# Altium PCB PCB_SPSU-v4.0.0.PcbDoc
Units mil, origin at the board's own origin, x right, y up, seen from the top; angles counter-clockwise.
Board outline 1757.74 x 2141.82 mil, 2 copper layers (Top Layer, Bottom Layer), stack 61.811 mil thick; 47 components, 33 nets, 165 pads, 303 vias.
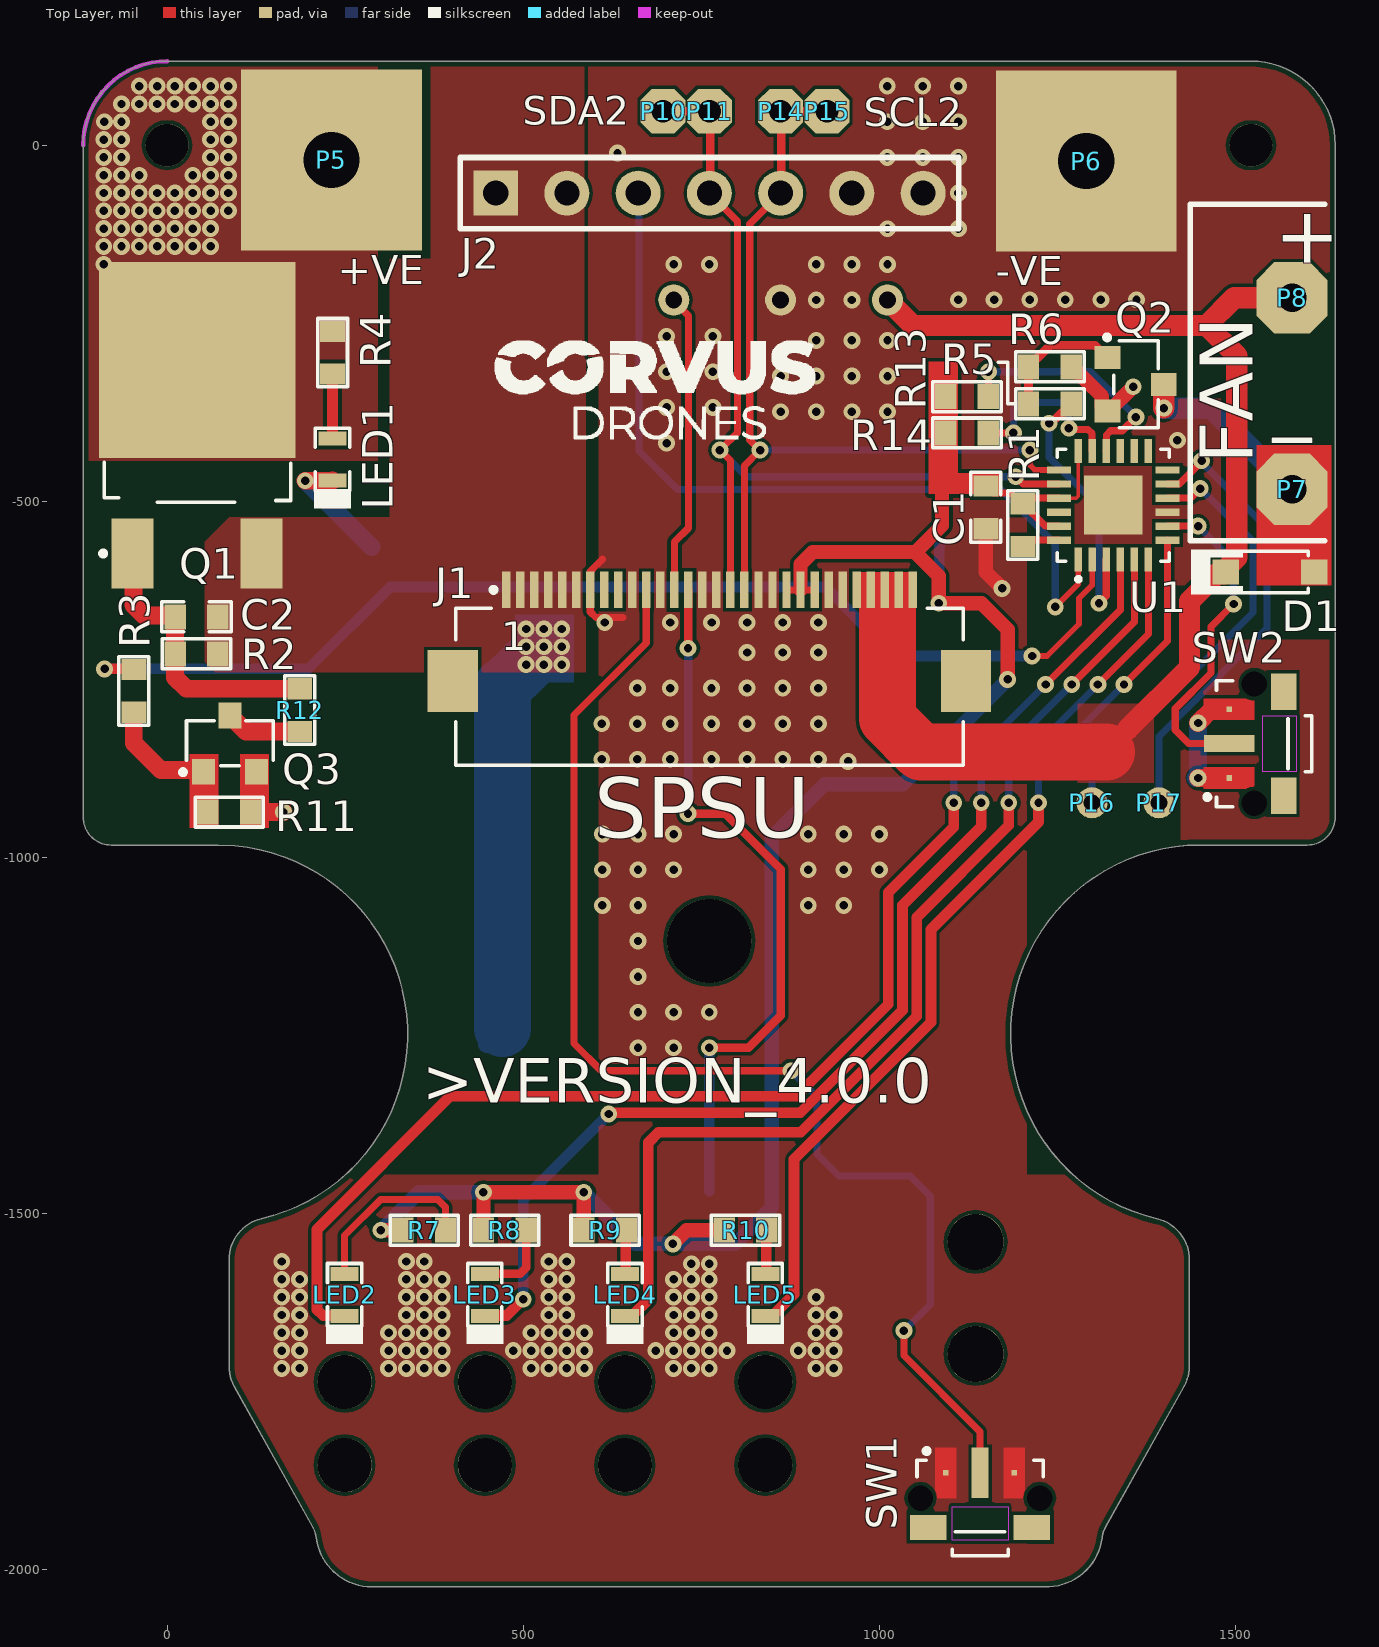
[diagram p0: Top Layer view]
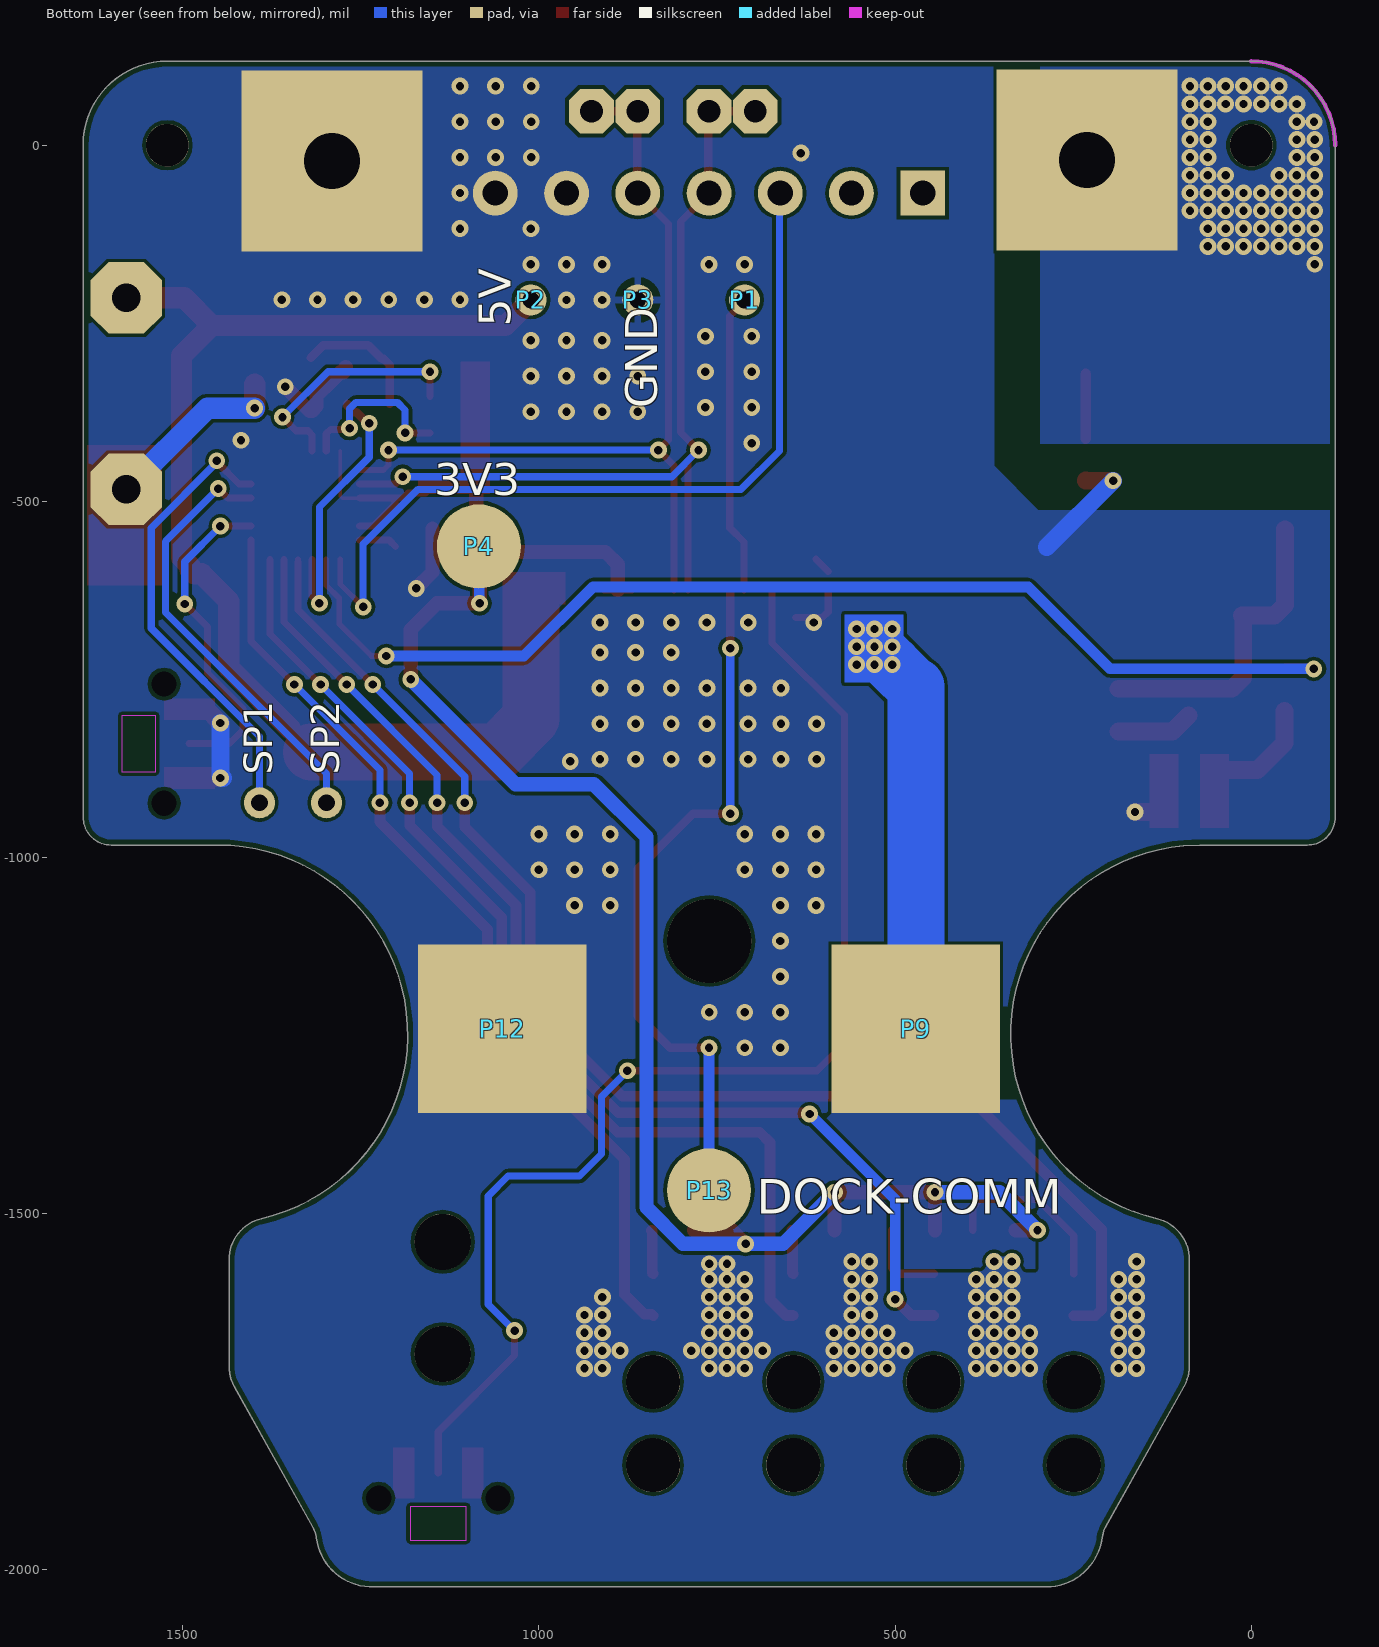
[diagram p1: Bottom Layer view, seen from below]
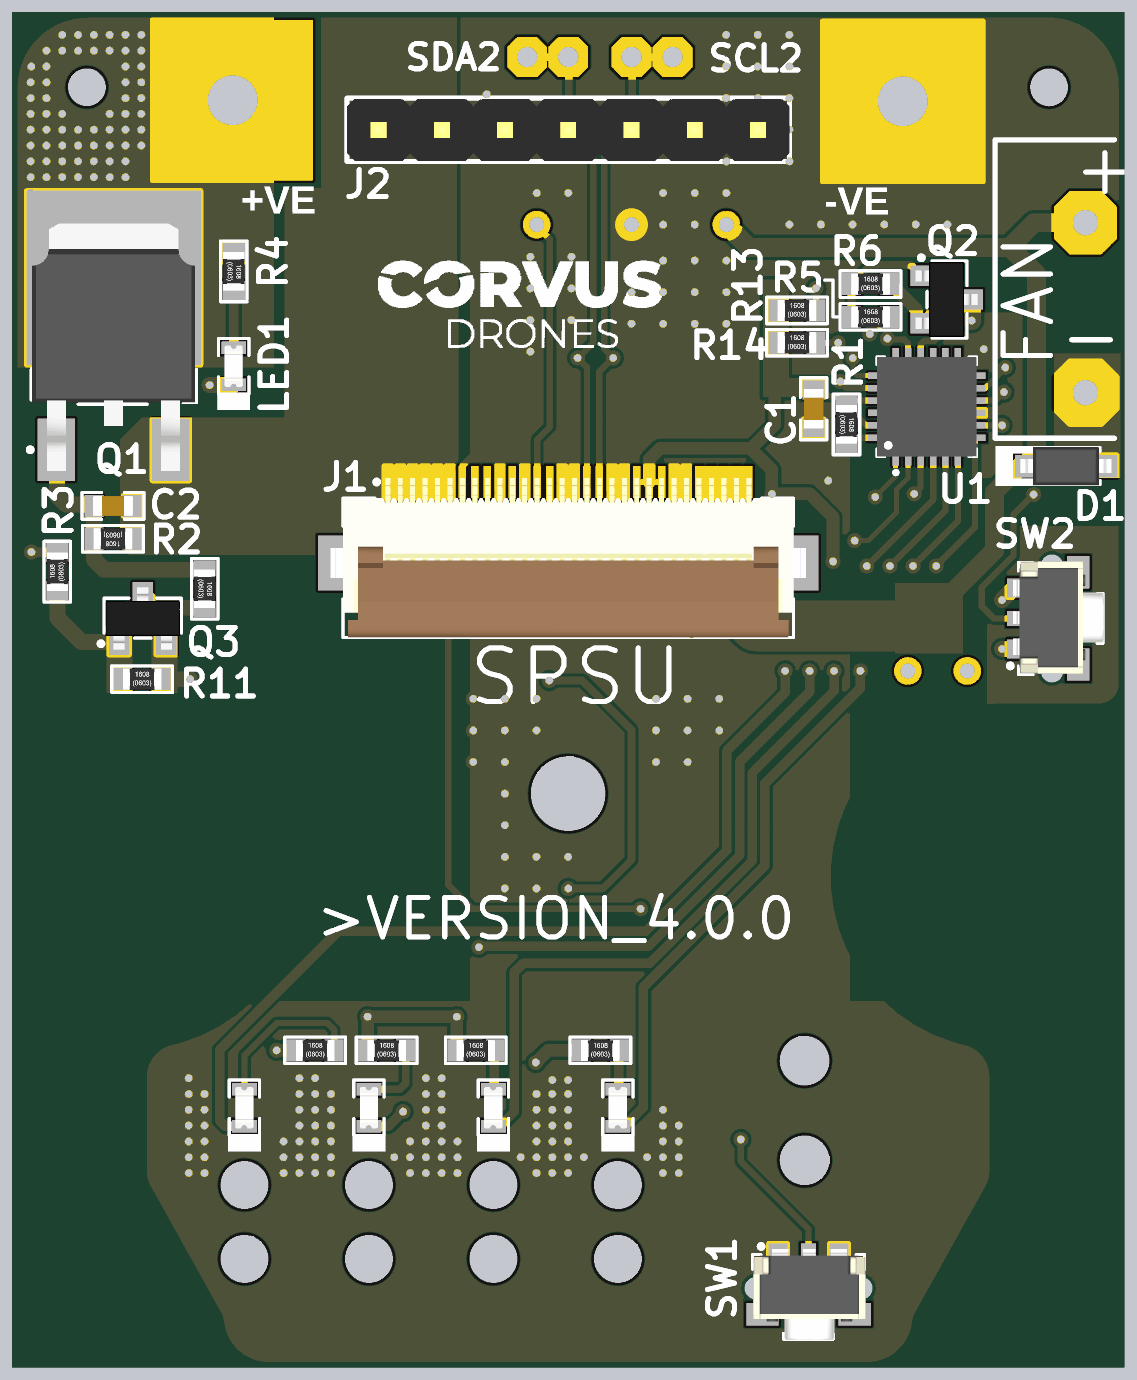
[diagram p2: 3D render of the assembled board from above, using the file's embedded part models]

## Layer stack, top to bottom
Top Solder: solder mask 0.3937, Solder Resist, Dk 3.5
Top Layer: signal copper 1.378
Dielectric 1: core 59.0551, FR-4, Dk 4.8
Bottom Layer: signal copper 1.378
Bottom Solder: solder mask 0.3937, Solder Resist, Dk 3.5

## Board outline
204.87,-1940.69 94.44,-1742.51 cw(c146.03,-1713.76) 86.97,-1713.76 86.97,-1564.54 cw(c146.02,-1564.54) 132.57,-1507.04 ccw(c72.05,-1248.28) 95.21,-983.54 72.05,-982.52 -78.47,-982.52 cw(c-78.47,-943.15) -117.84,-943.15 -117.84,-0.15 cw(c0.27,-0.14) -10.03,117.52 0.27,117.96 1521.79,117.96 cw(c1521.8,-0.15) 1639.46,10.15 1639.9,-0.15 1639.9,-943.15 cw(c1600.53,-943.15) 1603.97,-982.37 1600.53,-982.52 1450.01,-982.52 ccw(c1450.01,-1248.27) 1389.49,-1507.04 cw(c1376.04,-1564.54) 1435.09,-1564.54 1435.09,-1713.76 cw(c1376.03,-1713.76) 1427.62,-1742.51 1317.19,-1940.69 ccw(c1351.56,-1959.88) 1314.38,-1946.95 1313.4,-1950.24 1312.71,-1953.6 1312.52,-1954.94 cw(c1234.4,-1945.12) 1238.29,-2023.76 1234.39,-2023.86 287.67,-2023.86 cw(c287.67,-1945.12) 211.61,-1965.5 210.12,-1958.8 209.54,-1954.94 208.1,-1948.23 206.94,-1945 205.51,-1941.88

## Design rules (kind name [scope] priority, off if disabled: settings)
BoardOutlineClearance mdCopperDimension [All] p1: gap=10 ignorepadtopadclearanceinfootprint=FALSE except(0: Arc-SplitContinuation Track-SplitContinuation SMDPad-SplitContinuation THPad-SplitContinuation Via-SplitContinuation Fill-SplitContinuation Poly-SplitContinuation Region-SplitContinuation Text-SplitContinuation; 1: Arc-OutlineEdge Fill-OutlineEdge Text-OutlineEdge; 5: Track-OutlineEdge; 7.87: Poly-OutlineEdge Poly-CavityEdge Poly-CutoutEdge Poly-SplitBarrior)
Clearance [All] p1: gap=5 ignorepadtopadclearanceinfootprint=FALSE
HoleSize [All] p1: absolutevalues=TRUE maxlimit=99999 minlimit=11.8 maxpercent=80.000 minpercent=20.000
HoleToHoleClearance [All] p1: gap=6 allowstackedmicrovias=TRUE
MinimumSolderMaskSliver [All] p1: minsoldermaskwidth=0
PolygonConnect [All] p1: connectstyle=Direct reliefconductorwidth=10 reliefentries=4 polygonreliefangle="90 Angle" airgapwidth=10
RoutingVias [All] p1: holewidth=11.81 width=23.62 viastyle="Through Hole" minholewidth=11.81 minwidth=23.62 maxholewidth=100 maxwidth=100
SilkToSilkClearance [All] p1: silktosilkclearance=3
SilkToSolderMaskClearance [IsPad] p1: minsilkscreentomaskgap=0 clearancetoexposedcopper=TRUE
SolderMaskExpansion [All] p1: expansion=4 istentingtop=FALSE
UnRoutedNet [All] p1: checkbadconnections=TRUE
Width [All] p1: maxlimit=100 minlimit=5 preferedwidth=12 minimp=50.000000 maximp=50.000000 favimp=50.000000
24 further rules are at their usual default settings.

## Classes and differential pairs
component class "U_Pad Connections": J2 P9 P10 P11 P12 P13 P14 P15
component class "U_MOSFET Driving": C2 D1 LED1 P5 P6 P7 P8 Q1 Q2 Q3 R2 R3 R4 R5 R6 R11 R12
component class U_IO-Extender: C1 P16 P17 R1 R13 R14 SW2 U1
component class "U_HMI Part": LED2 LED3 LED4 LED5 R7 R8 R9 R10 SW1
component class "U_Connection Powermodule": J1 P1 P2 P3 P4

## Components (designator, comment, footprint, x,y, rotation, side; value= is the part's Value field where it differs from the comment)
C1 "0.1uF" CAP-0603 1149.3,-508.46 r90 top
C2 "0.1uF" CAP-0603 41.27,-662.14 r0 top
D1 "1N4148W" SOD-123 1548.27,-599.14 r180 top
J1 "FH12-30S-0.5SH(55)" FH12-30S-0.5SH(55) 761.3,-688.31 r0 top locked
J2 "DNP" "HDR 1X7" 461.3,-67.31 r90 top locked
LED1 "BLUE" LED-0603 232.3,-441.31 r270 top
LED2 "WHITE" LED-0603 249.22,-1613.92 r270 top
LED3 "WHITE" LED-0603 446.07,-1613.92 r270 top
LED4 "WHITE" LED-0603 642.92,-1613.92 r270 top
LED5 "WHITE" LED-0603 839.77,-1613.92 r270 top
P1 "THT Pad" TH-0.75/0.6 711.3,-217.31 r90 bottom locked
P2 "THT Pad" TH-0.75/0.6 1011.3,-217.31 r90 bottom locked
P3 "THT Pad" TH-0.75/0.6 861.3,-217.31 r90 bottom locked
P4 "SMD-Pad3mm" "3MM SMD PAD" 1084.3,-563.31 r180 bottom
P5 "THT-Pad 6.5mm" 6.5MM-THTPAD#1 430.27,-41.14 r0 top
P6 "THT-Pad 6.5mm" 6.5MM-THTPAD#2 856.27,-52.39 r0 top
P7 "Wirepad 2.54/1.0" "WIREPAD 2.54/1.0" 1579.3,-483.14 r0 top locked
P8 "Wirepad 2.54/1.0" "WIREPAD 2.54/1.0" 1579.3,-214.31 r0 top locked
P9 "SMD-Pad6mm" "6.0MM-SMD PAD" 471.02,-1240.44 r180 bottom locked
P10 "Wirepad" WIREPAD#1 696.3,47.69 r0 top locked
P11 "Wirepad" WIREPAD#2 736.27,47.69 r0 top locked
P12 "SMD-Pad6mm" "6.0MM-SMD PAD" 1051.58,-1240.44 r180 bottom locked
P13 "SMD-Pad3mm" "3MM SMD PAD" 761.3,-1467.31 r180 bottom locked
P14 "Wirepad" WIREPAD#1 861.3,47.69 r0 top locked
P15 "Wirepad" WIREPAD#3 952.27,177.86 r0 top
P16 "THT Pad" TH-0.75/0.6 1298.27,-923.14 r90 top
P17 "THT Pad" TH-0.75/0.6 1392.27,-923.14 r90 top
Q1 "FDD4141(UMW)" TO-252-2L 42.3,-437.31 r0 top locked
Q2 "2N7002KT1G" SOT-23 1359.64,-335.74 r270 top
Q3 "2N7002KT1G" SOT-23 88.27,-840.14 r0 top
R1 "100K" RES-0603 1201.3,-533.31 r90 top
R2 "100K" RES-0603 41.27,-714.14 r0 top
R3 "4.7K" RES-0603 -46.73,-766.14 r270 top
R4 "1K" RES-0603 232.3,-291.31 r90 top
R5 "4.7K" RES-0603 1239.27,-363.14 r180 top
R6 "100K" RES-0603 1239.27,-311.31 r180 top
R7 "20R" RES-0603 361.03,-1523.17 r180 top
R8 "20R" RES-0603 474.03,-1523.17 r180 top
R9 "20R" RES-0603 615.03,-1523.17 r180 top
R10 "20R" RES-0603 812.03,-1523.17 r180 top
R11 "100K" RES-0603 87.27,-936.14 r180 top
R12 "4.7K" RES-0603 186.27,-793.14 r90 top
R13 "4.7K" RES-0603 1123,-353 r180 top
R14 "DNP" RES-0603 1123,-404 r180 top
SW1 "TL3340AF160QG" TL3340AF160QG 1141.3,-1902.31 r0 top
SW2 "TL3340AF160QG" TL3340AF160QG 1529.27,-840.14 r90 top locked
U1 "PCAL6416AHF,128" QFN-24-EP(4X4) 1328.3,-505.31 r90 top locked

## Footprints (in the part's own frame and the unit in brackets; to place one, negate y for a bottom-side part, rotate by r counter-clockwise, add the part's x,y. Pads: shape width x height; smd on the part's side, far side on the other; paste and mask are expansions set on the pad)
"3MM SMD PAD" [mm]
  round 3 smd: 1(0,0)
"6.0MM-SMD PAD" [mm]
  rect 6x6 smd: 1(0,0)
6.5MM-THTPAD#1 [mil]
  rect 254x254 hole 78.74: 1(-199.72,20.58)
6.5MM-THTPAD#2 [mil]
  rect 254x254 hole 78.74: 1(434.03,30.08)
CAP-0603 [mil]
  rect 30x35 smd mask+2.36: 1(-30,0) 2(30,0)
  silkscreen extent -49,-21 49,21, body extent -32,-16 31,16, height 34
FH12-30S-0.5SH(55) [mm]
  rect 0.3x1.3 smd paste-2: 1(-7.25,1.625) 2(-6.75,1.625) 3(-6.25,1.625) 4(-5.75,1.625) 5(-5.25,1.625) 6(-4.75,1.625) 7(-4.25,1.625) 8(-3.75,1.625) 9(-3.25,1.625) 10(-2.75,1.625) 11(-2.25,1.625) 12(-1.75,1.625) 13(-1.25,1.625) 14(-0.75,1.625) 15(-0.25,1.625) 16(0.25,1.625) 17(0.75,1.625) 18(1.25,1.625) 19(1.75,1.625) 20(2.25,1.625) 21(2.75,1.625) 22(3.25,1.625) 23(3.75,1.625) 24(4.25,1.625) 25(4.75,1.625) 26(5.25,1.625) 27(5.75,1.625) 28(6.25,1.625) 29(6.75,1.625) 30(7.25,1.625)
  rect 1.8x2.2 smd: S1(-9.15,-1.625) S2(9.15,-1.625)
  silkscreen extent -9.05,-4.62 9.05,1.68, body extent -9.55,-4.62 9.55,1.78, height 2.09
"HDR 1X7" [mm]
  rect 1.6x1.6 hole 0.9: 1(0,0)
  round 1.6 hole 0.9: 2(0,-2.54) 3(0,-5.08) 4(0,-7.62) 5(0,-10.16) 6(0,-12.7) 7(0,-15.24)
  silkscreen extent -1.27,-16.51 1.27,1.27, body extent -1.24,-16.51 1.25,1.27, height 8.74
LED-0603 [mm]
  rect 0.5x1 smd: 1(-0.75,0) 2(0.75,0)
  silkscreen extent -1.12,-0.66 1.75,0.66, body extent -0.82,-0.37 0.82,0.36, height 0.68
QFN-24-EP(4X4) [mm]
  rect 0.86x0.26 smd: 1(-1.935,1.25) 2(-1.935,0.75) 3(-1.935,0.25) 4(-1.935,-0.25) 5(-1.935,-0.75) 6(-1.935,-1.25) 13(1.935,-1.25) 14(1.935,-0.75) 15(1.935,-0.25) 16(1.935,0.25) 17(1.935,0.75) 18(1.935,1.25)
  rect 0.26x0.86 smd: 7(-1.25,-1.935) 8(-0.75,-1.935) 9(-0.25,-1.935) 10(0.25,-1.935) 11(0.75,-1.935) 12(1.25,-1.935) 19(1.25,1.935) 20(0.75,1.935) 21(0.25,1.935) 22(-0.25,1.935) 23(-0.75,1.935) 24(-1.25,1.935)
  rect 2.1x2.1 smd paste-0.39: 25(0,0)
  silkscreen extent -2.69,-2 2,2, body extent -2,-2 2,2, height 0.8
RES-0603 [mil]
  rect 30x35 smd: 1(-30,0) 2(30,0)
  silkscreen extent -48,-21 48,21, body extent -31,-17 31,17, height 18
SOD-123 [mm]
  rect 0.95x0.9 smd: 1(-1.575,0) 2(1.575,0)
  silkscreen extent -1.37,-0.8 2.82,0.8, body extent -1.82,-0.78 1.83,0.78, height 1.5
SOT-23 [mm] "TRANS NPN 40V 0.6A SOT23"
  rect 0.82x0.92 smd: 1(-0.95,-1) 2(0.95,-1) 3(0,1)
  silkscreen extent -1.73,-1.07 1.55,0.81, body extent -1.5,-1.25 1.5,1.25, height 1.05
TH-0.75/0.6 [mm]
  round 1.108 hole 0.6: 1(0,0)
TL3340AF160QG [mm]
  rect 0.2x0.2 smd paste-1 mask+0: 1(-1.225,0.975) 1(-1.225,0.975) 3(1.225,0.975) 3(1.225,0.975)
  rect 0.6x1.8 smd: 2(0,0.975)
  rect 1.3x0.9 smd: S1(-1.85,-0.975) S2(1.85,-0.975)
  round 0 hole 0.9 unplated: ""(-2.125,0.075) ""(2.125,0.075)
  Top Layer region: -0.85,0.075 -1.525,0.075 -1.525,0.084 -1.525,0.102 -1.526,0.12 -1.529,0.138 -1.53,0.146 -1.53,0.146 -1.531,0.155 -1.533,0.173 -1.536,0.191 -1.54,0.209 -1.543,0.218 -1.545,0.228 -1.551,0.25 -1.557,0.271 -1.565,0.292 -1.569,0.302 -1.572,0.311 -1.579,0.327 -1.587,0.343 -1.595,0.358 -1.6,0.365 -1.6,0.375 -1.6,1.875 -0.85,1.875
  Top Layer region: 1.6,0.375 1.6,0.365 1.595,0.358 1.587,0.343 1.579,0.327 1.572,0.311 1.569,0.302 1.565,0.292 1.557,0.271 1.551,0.25 1.545,0.228 1.543,0.218 1.54,0.209 1.536,0.191 1.533,0.173 1.531,0.155 1.53,0.146 1.53,0.146 1.529,0.138 1.526,0.12 1.525,0.102 1.525,0.084 1.525,0.075 0.85,0.075 0.85,1.875 1.6,1.875
  Keep-Out Layer region: 1,-1.425 -1,-1.425 -1,-0.225 1,-0.225
  silkscreen extent -2.25,-1.97 2.25,1.8, body extent -2.21,-2.01 2.29,1.65, height 3.21
TO-252-2L [mm]
  rect 1.5x2.5 smd: 1(-2.3,-3.45) 3(2.3,-3.45)
  rect 7x7 smd: 2(0,3.45)
  silkscreen extent -3.4,-3.51 3.33,-0.2, body extent -3.27,-4.31 3.27,5.63, height 2.34
WIREPAD#1 [mm]
  oct 1.6x1.6 hole 0.813: 1(0,0)
WIREPAD#2 [mm]
  oct 1.6x1.6 hole 0.813: 1(0.636,0)
WIREPAD#3 [mm]
  oct 1.6x1.6 hole 0.813: 1(-0.66,-3.306)
"WIREPAD 2.54/1.0" [mil]
  oct 100x100 hole 40: 1(0,0)

## Part data
C1 C2: library part CC0603KRX7R0BB104, "CAP CER 0.1UF 100V X7R 0603", Capacitance=100nF, Case Code (Imperial)=0603, Case Code (Metric)=1608, Dielectric=X7R, LCSC Part Number=C113803, MAnufacturer=Yageo, Max Operating Temperature=125°C, Min Operating Temperature=-55°C, Package Quantity=4000, Resistor Type=Ceramic, Supplier Part Number 1=311-1523-1-ND, Tolerance=10%, Voltage Rating=100V, Case/Package=0603, Category="Ceramic Capacitors", ComponentLink1Description=https://datasheet.ciiva.com/6277/mlccorderingcode-6277030.pdf?src-supplier=Digi-Key, ComponentLink1URL=https://datasheet.ciiva.com/6277/mlccorderingcode-6277030.pdf?src-supplier=Digi-Key, ComponentLink2Description=https://datasheet.ciiva.com/6277/mlccorderingcode-6277081.pdf?src-supplier=Digi-Key, ComponentLink2URL=https://datasheet.ciiva.com/6277/mlccorderingcode-6277081.pdf?src-supplier=Digi-Key, ComponentLink3Description=https://datasheet.ciiva.com/6277/mlccorderingcode-6277082.pdf?src-supplier=Digi-Key, ComponentLink3URL=https://datasheet.ciiva.com/6277/mlccorderingcode-6277082.pdf?src-supplier=Digi-Key, Depth=0.8mm, Item Type=Capacitor, Lead Free="Lead Free", Length=0.063inch, Manufacturer Part Number=CC0603KRX7R0BB104, Mount="Surface Mount", Packaging="Tape and Reel", Pricing 1="1=0.19000, 10=0.13500, 50=0.07680, 100=0.06370, 500=0.04466, 1000=0.03696 (USD)", RoHS=Yes, RoHS Compliant=Yes, Series=CC, Stock 1=60476, Supplier 1=Digi-Key, Termination=SMD/SMT, Thickness=0.035inch, Voltage Rating (DC)=100V, Weight=7.1E-05oz, Width=0.031inch
D1: LCSC Part Number=C917030, MAnufacturer=JSMSEMI, Package=SOD-123, ComponentLink1Description=LCSC, ComponentLink1URL=https://www.lcsc.com/product-detail/Switching-Diode_JSMSEMI-1N4148W_C917030.html, Item=Diode, Manufacturer Part Number=1N4148W
J1: "CONN FFC BOTTOM 30POS 0.5MM R/A", Actuator Color=Brown, Color=Beige,Brown, Contact Resistance=50mR, Contact Voltage Rating (AC)=50V, Current Rating=500mA, Flammability Rating="UL94 V-0", Housing Color=Beige, Insulation Resistance=500MR, LCSC Part Number=C506793, MAnufacturer=Hirose, Max Current Rating=400mA, Max Operating Temperature=70°C, Min Operating Temperature=-40°C, Package Quantity=2000, Supplier Part Number=7018136, Actuator Material=Polyphenylene, Category="FFC / FPC", ComponentLink1Description=https://datasheet.ciiva.com/11745/0900766b80d985fc-11745247.pdf?src-supplier=Rs, ComponentLink1URL=https://datasheet.ciiva.com/11745/0900766b80d985fc-11745247.pdf?src-supplier=Rs, ComponentLink2Description=https://datasheet.ciiva.com/15176/getdatasheetpartid-439676-15176854.pdf?src-supplier=Verical, ComponentLink2URL=https://datasheet.ciiva.com/15176/getdatasheetpartid-439676-15176854.pdf?src-supplier=Verical, ComponentLink3Description=https://datasheet.ciiva.com/7661/58803-7661387.pdf?src-supplier=Element14, ComponentLink3URL=https://datasheet.ciiva.com/7661/58803-7661387.pdf?src-supplier=Element14, ComponentLink4Description=https://datasheet.ciiva.com/22630/58803-22630360.pdf?src-supplier=Farnell, ComponentLink4URL=https://datasheet.ciiva.com/22630/58803-22630360.pdf?src-supplier=Farnell, Connector type=4640ConnectorType, Contact Location=Bottom, Contact Material=Bronze, Contact Pitch=500um, Contact Plating=Gold, Depth=5.6mm, Gender=Female, Housing Material=Polyamide, Item Type="FFC/FPC Connector", Lead Free="Lead Free", Lead Pitch=0.5mm, Length=19.1mm, Manufacturer Part Number=FH12-30S-0.5SH(55), Material=Polyamide, Mating Cycles=20, Max Voltage Rating (AC)=50V, Mounting Technology="Surface Mount", Number of Contacts=30, Number of Positions=30, Number of Rows=1, Orientation="Right Angle", Packaging="Tape and Reel", Pitch=0.5mm, Pricing="1=2.27, 15=2.07, 50=1.97, 250=1.85, 1000=1.75 (USD)", Radiation Hardening=No, Reach SVHC Compliant=No, RoHS=Yes, RoHS Compliant=Yes, Series=FH12, Stock=1200, Supplier="Future Electronics", Termination=Solder, Voltage Rating=50V, Voltage Rating (AC)=50V, Width=19.1mm, Wire/Cable Type=Straight
J2: library part PZ254V-11-07P, LCSC Part Number=C492406, MAnufacturer=XFCN, Package=2.54mm, ComponentLink1Description=LCSC, ComponentLink1URL=https://www.lcsc.com/product-detail/Pin-Headers_XFCN-PZ254V-11-07P_C492406.html, Item Type=Header, Manufacturer Part Number=PZ254V-11-07P
LED1: library part NCD0603B1, "10mA 无色透明透镜 80mcd~220mcd 463nm~475nm -30℃~+85℃ Blue 130° 72mW 2.6V~3.6V 0603 Light Emitting Diodes (LED) ROHS", LCSC Part Number=C84266, MAnufacturer="Foshan NationStar Optoelectronics", Package=0603, ComponentLink1Description=LCSC, ComponentLink1URL=https://www.lcsc.com/product-detail/Light-Emitting-Diodes-LED_Foshan-NationStar-Optoelectronics-NCD0603B1_C84266.html, Item Type=LED, Manufacturer Part Number=NCD0603B1
LED2 LED3 LED4 LED5: library part NCD0603W1, "5mA 200mcd~300mcd 雾状黄透镜 -30℃~+85℃ White 130° 72mW 2.6V~3.6V 0603 Light Emitting Diodes (LED) ROHS", LCSC Part Number=C84265, MAnufacturer="Foshan NationStar Optoelectronics", Package=0603, ComponentLink1Description=LCSC, ComponentLink1URL=https://www.lcsc.com/product-detail/Light-Emitting-Diodes-LED_Foshan-NationStar-Optoelectronics-NCD0603W1_C84265.html, Item Type=LED, Manufacturer Part Number=NCD0603W1
P1 P2 P3 P16 P17: library part TH-0.75/0.6
P4 P13: "Wire Conncting PAD"
Q1: "TO-252 MOSFETs ROHS", LCSC Part Number=C5346825, MAnufacturer=UMW, Package=TO-252, Item Type=MOSFET, Manufacturer Part Number=FDD4141(UMW)
Q2 Q3: "MOSFET N-CH 60V 320MA SOT23-3", Case/Package=SOT-23-3, Continuous Drain Current (ID)=320mA, Drain to Source Breakdown Voltage=60V, Drain to Source Resistance=1.6R, Gate to Source Voltage (Vgs)=20V, Input Capacitance=24.5pF, LCSC Part Number=C116584, MAnufacturer="ON Semiconductor", Max Operating Temperature=150°C, Max Power Dissipation=420mW, Min Operating Temperature=-55°C, Package Quantity=1, Power Dissipation=300mW, Supplier Part Number=3445699, Threshold Voltage=2.3V, Category=MOSFETs, ComponentLink1Description=https://datasheet.ciiva.com/1254/2n7002k-d-1254499.pdf?src-supplier=Newark, ComponentLink1URL=https://datasheet.ciiva.com/1254/2n7002k-d-1254499.pdf?src-supplier=Newark, ComponentLink2Description=https://datasheet.ciiva.com/16220/2n7002k-d-16220919.pdf?src-supplier=Future+Electronics, ComponentLink2URL=https://datasheet.ciiva.com/16220/2n7002k-d-16220919.pdf?src-supplier=Future+Electronics, ComponentLink3Description=https://datasheet.ciiva.com/936/2n7002k-d-936793.pdf?src-supplier=Digikey, ComponentLink3URL=https://datasheet.ciiva.com/936/2n7002k-d-936793.pdf?src-supplier=Digikey, Contact Plating=Tin,Matte, Drain-source On Resistance-Max=1.6R, Element Configuration=Single, Fall Time=9ns, Halogen Free="Halogen Free", Height=1.01mm, Item Type=MOSFET, Lead Free="Lead Free", Length=3.04mm, Manufacturer Part Number=2N7002KT1G, Nominal Vgs=2.3V, Number of Channels=1NUMBER, Number of Elements=1, Packaging="Tape and Reel", Pins=3, Polarity=N-CHANNEL, Pricing="3000=0.0238, 12000=0.0228, 45000=0.0218, 75000=0.0215, 150000=0.0204 (USD)", Radiation Hardening=No, Rds On Max=1.6R, Reach SVHC Compliant=No, Rise Time=9ns, RoHS=Yes, RoHS Compliant=Yes, Series=-, Stock=51000, Supplier="Future Electronics", Turn-Off Delay Time=55.8ns, Turn-On Delay Time=12.2ns, Width=1.4mm
R1 R2 R6 R11: library part RC0603JR-07100KL, "RES 100K OHM 5% 1/10W 0603", Case Code (Imperial)=0603, Case Code (Metric)=1608, LCSC Part Number=C100048, MAnufacturer=Yageo, Max Operating Temperature=155°C, Max Power Dissipation=100mW, Min Operating Temperature=-55°C, Resistance=100kR, Resistance Tolerance=5%, Resistor Type="Thick Film", Supplier Part Number 1=311-100KGRCT-ND, Temperature Coefficient=100ppm/°C, Voltage Rating=50V, Case/Package=0603, Category="Chip SMD Resistors", ComponentLink1Description=https://datasheet.ciiva.com/7746/443971-7746424.pdf?src-supplier=Element14, ComponentLink1URL=https://datasheet.ciiva.com/7746/443971-7746424.pdf?src-supplier=Element14, ComponentLink2Description=https://datasheet.ciiva.com/7983/443971-7983686.pdf?src-supplier=Element14, ComponentLink2URL=https://datasheet.ciiva.com/7983/443971-7983686.pdf?src-supplier=Element14, ComponentLink3Description=https://datasheet.ciiva.com/7746/443971-7746423.pdf?src-supplier=Element14, ComponentLink3URL=https://datasheet.ciiva.com/7746/443971-7746423.pdf?src-supplier=Element14, ComponentLink4Description=https://datasheet.ciiva.com/8887/pyu-rc0603-51-rohs-l-4-8887903.pdf?src-supplier=Avnet, ComponentLink4URL=https://datasheet.ciiva.com/8887/pyu-rc0603-51-rohs-l-4-8887903.pdf?src-supplier=Avnet, Contact Plating=Tin,Matte, Features="Moisture Resistant", Item Type=Resistor, Lead Free="Lead Free", Manufacturer Part Number=RC0603JR-07100KL, Number of Pins=2, Number of Terminations=2, Packaging="Tape and Reel", Power Rating=100mW, Pricing 1="1=0.10000, 10=0.02000, 100=0.00800, 1000=0.00360, 2500=0.00312 (USD)", Radiation Hardening=No, REACH SVHC="No SVHC", RoHS=Yes, RoHS Compliant=Yes, Series=RC, Size Code=0603, Stock 1=1210037, Supplier 1=Digi-Key, Termination=SMD/SMT, Tolerance=5%, Voltage Rating (DC)=50V, Width=0.8mm
R3 R5 R12 R13: library part RC0603FR-074K7L, "RES SMD 4.7K OHM 1% 1/10W 0603", LCSC Part Number=C99782, MAnufacturer=Yageo, Package=0603, ComponentLink7Description=LCSC, ComponentLink7URL=https://www.lcsc.com/product-detail/Chip-Resistor-Surface-Mount_YAGEO-RC0603FR-074K7L_C99782.html, Item Type=Resistor, Manufacturer Part Number=RC0603FR-074K7L
R4: library part RC0603FR-071KL, "100mW Thick Film Resistors 75V ±100ppm/℃ ±1% 1kΩ 0603 Chip Resistor - Surface Mount ROHS", LCSC Part Number=C22548, MAnufacturer=YAGEO, Package=0603, ComponentLink1Description=LCSC, ComponentLink1URL=https://www.lcsc.com/product-detail/Chip-Resistor-Surface-Mount_YAGEO-RC0603FR-071KL_C22548.html, Item=Resistor, Manufacturer Part Number=RC0603FR-071KL
R7 R8 R9 R10: library part 0603WAF200JT5E, "100mW Thick Film Resistors ±100ppm/℃ ±1% 20Ω 0603 Chip Resistor - Surface Mount ROHS", LCSC Part Number=C22950, MAnufacturer="UNI-ROYAL(Uniroyal Elec)", Package=0603, ComponentLink1Description=LCSC, ComponentLink1URL=https://www.lcsc.com/product-detail/Chip-Resistor-Surface-Mount_UNI-ROYAL-Uniroyal-Elec-0603WAF200JT5E_C22950.html, Item Type=Resistor, Manufacturer Part Number=0603WAF200JT5E
R14: Package=0603, ComponentLink1Description=LCSC, Item Type=Resistor
SW1 SW2: "Switch Tactile N.O. SPST Round Button Gull Wing 0.05A 12VDC 100000Cycles 1.57N SMD", Case/Package=SMD/SMT, Color=White, Contact Current Rating=50mA, Contact Resistance=500mR, MAnufacturer=E-Switch, Max Operating Temperature=85°C, Max Voltage Rating (DC)=12V, Min Operating Temperature=-35°C, Operating Force=160gf, Package Quantity=1, Supplier Part Number=9232661, Actuator Length=0.85mm, Actuator Material=Polyphthalamide, Actuator Type=Standard, Category="Tactile Switches", ComponentLink1Description=https://datasheet.ciiva.com/7637/tl3340-7637667.pdf?src-supplier=Element14, ComponentLink1URL=https://datasheet.ciiva.com/7637/tl3340-7637667.pdf?src-supplier=Element14, ComponentLink2Description=https://datasheet.ciiva.com/5284/tl3340-28153-5284108.pdf?src-supplier=Mouser, ComponentLink2URL=https://datasheet.ciiva.com/5284/tl3340-28153-5284108.pdf?src-supplier=Mouser, ComponentLink3Description=https://datasheet.ciiva.com/2900/p021301b-2900825.pdf?src-supplier=Digikey, ComponentLink3URL=https://datasheet.ciiva.com/2900/p021301b-2900825.pdf?src-supplier=Digikey, ComponentLink4Description=https://datasheet.ciiva.com/2900/p021301b-2900826.pdf?src-supplier=Digikey, ComponentLink4URL=https://datasheet.ciiva.com/2900/p021301b-2900826.pdf?src-supplier=Digikey, ComponentLink5Description=https://datasheet.ciiva.com/2900/p021301b-2900827.pdf?src-supplier=Digikey, ComponentLink5URL=https://datasheet.ciiva.com/2900/p021301b-2900827.pdf?src-supplier=Digikey, Contact Material="Stainless Steel,Silver", Contact Plating="Stainless Steel,Silver", Current Rating=50mA, Electrical Life=100000Cycles, Height=3.55mm, Housing Material=Polyphthalamide, Illumination Type=Non-Illuminated,Illuminated, Lead Free=5697LeadFree, Manufacturer Part Number=TL3340AF160QG, Mechanical Life=100000Cycles, Mounting Technology="Surface Mount", Number of Positions=2NUMBER, Orientation="Right Angle", Packaging="Tape and Reel", Pricing="2000=0.27 (USD)", Reach SVHC Compliant=No, RoHS=Yes, RoHS Compliant=Yes, Series=TL3340, Size=3.3mm, Stock=16000, Supplier="Future Electronics", Switch Function=Off-Mom, Switch Travel=0.2mm, Termination="Gull Wing", Throw Configuration=SPST, Voltage Rating (DC)=12V
U1: "IC XPND 400KHZ I2C SMBUS 24HWQFN", Clock Frequency=100kHz, Frequency=400kHz, LCSC Part Number=C2652287, MAnufacturer="NXP Semiconductors", Max Operating Temperature=85°C, Max Supply Voltage=5.5V, Min Operating Temperature=-40°C, Min Supply Voltage=1.65V, Nominal Supply Current=1.1mA, Output Current=25mA, Package Quantity=1, Supplier Part Number=75X0096, Category="Interface ICs", ComponentLink1Description=https://datasheet.ciiva.com/46433/1845292-46433847.pdf?src-supplier=Element14, ComponentLink1URL=https://datasheet.ciiva.com/46433/1845292-46433847.pdf?src-supplier=Element14, ComponentLink2Description=https://datasheet.ciiva.com/6633/pcal6416a-6633094.pdf?src-supplier=Digikey, ComponentLink2URL=https://datasheet.ciiva.com/6633/pcal6416a-6633094.pdf?src-supplier=Digikey, ComponentLink3Description=https://datasheet.ciiva.com/6633/pcal6416a-6633096.pdf?src-supplier=Digikey, ComponentLink3URL=https://datasheet.ciiva.com/6633/pcal6416a-6633096.pdf?src-supplier=Digikey, Height=800um, Interface=I2C, Item Type=IC, Lead Free="Lead Free", Manufacturer Part Number=PCAL6416AHF,128, Mounting Technology="Surface Mount", Number of I/Os=16, Packaging="Tape and Reel", Pins=24, Pricing="1=1.23, 10=1.05, 25=0.969, 50=0.887 (USD)", Reach SVHC Compliant=No, RoHS=Yes, RoHS Compliant=Yes, Series=-, Stock=5086, Supplier=Avnet

## Free pads (board coordinates)
  round 75.98 hole 75.98 unplated: MH1(839.77,-1853) MH2(839.77,-1736.07) MH3(249.22,-1736.07) MH4(249.22,-1853) MH5(446.07,-1736.07) MH6(642.92,-1853) MH7(642.92,-1736.07) MH8(446.07,-1853)
  round 78.74 hole 78.74 unplated: MH9(1135.05,-1539.52) MH10(1135.05,-1697)
  round 60 hole 60 unplated: MH11(0,0) MH12(1521.68,-0.11)
  round 118.11 hole 118.11 unplated: MH13(761.03,-1117.17)

## Via types
v1: diameter 23.62, hole 11.81, Top Layer to Bottom Layer, tented both sides, 214 vias
v2: diameter 23.62/23.62 (per signal layer), hole 11.81, Top Layer to Bottom Layer, tented both sides, 89 vias

## Nets (pads, with @x,y where several pads share a name; then routed paths per layer and width w, separated by ;. In a path a pad name is that pad's centre, name@x,y a point inside that pad or via, vN(x,y) a via of type N, cw(c..) or ccw(c..) an arc to the next point about the centre after c; other vN are vias at no path point)
+3V3: C1.2 J1.21 J1.22 J1.23 P4.1 R1.2 R7.2 R8.2 R9.2 R10.2 R13.2 R14.2 U1.18 U1.21 U1.23 | length 2783.5
  Top Layer w5: R1.2 R1.2@1209.14,-495.47 ; U1.21 1276.17,-495.47 1279.1,-492.54 U1.18
  Top Layer w10: J1.21 J1.22 J1.23 ; C1.2 1159.3,-488.46 1183.95,-488.46 1190.96,-495.47 1209.14,-495.47 U1.21 ; R1.2 1232.83,-534.84 U1.23
  Top Layer w15: C1.2@1136.3,-481.96 1139.3,-481.96 C1.2@1146.05,-475.21
  Top Layer w20: v1@301.36,-1523.17 R7.2 ; R8.2 v1(444.03,-1470) v1(585.03,-1470) R9.2 ; v1(710,-1542.37) 729.2,-1523.17 R10.2 ; J1.22 889.25,-588.34 906.45,-571.14 1049.62,-571.14 ; 1093,-467 1088,-472 1088,-534 1050.86,-571.14 1049.62,-571.14 ; v1(1180,-750) 1180,-680 1143.14,-643.14 v1(1083.27,-643.14) 1083.26,-604.78 1049.62,-571.14
  Bottom Layer w15: v1(1083.27,-643.14) 1083.79,-642.63 1083.79,-563.83 P4.1
  Bottom Layer w20: v1(300.17,-1523.17) 353.34,-1470 v1@444,-1470 ; v1(585.03,-1470) 657.4,-1542.37 v1(710,-1542.37) 797.63,-1542.37 849,-1491 849,-971 923,-897 1033,-897 v1(1180,-750)
+5V: D1.2 J1.26 J1.27 J1.28 J1.29 J1.30 P2.1 P8.1 | length 1757.4
  Top Layer w10: J1.26 J1.27
  Top Layer w30: P2.1 1047.13,-253.14 1459.27,-253.14 ; 1348.39,-820.02 1435.27,-733.14 1435.27,-640.12 1473.53,-601.86 1483.55,-601.86 D1.2 1487.25,-599.14 1489.96,-596.43 1489.96,-590.72 1501.83,-578.85 1501.83,-295.7 1459.27,-253.14 ; P8.1 1498.1,-214.31 1459.27,-253.14
  Top Layer w80: J1.28@1011.31,-647.96 1011.31,-805.14 1058.17,-852 1254,-852 1319,-852
DOCK-COMM: J1.14 P13.1 | length 1002.4
  Top Layer w12: v1(731.3,-938.29) 783.42,-938.29 861.3,-1016.17 861.3,-1222.11 816.27,-1267.14 v1(761.27,-1267.17) ; v1@731.77,-706.29 J1.14
  Bottom Layer w12: v1(731.3,-938.29) v1(731.3,-706.29)
  Bottom Layer w15: P13.1@761.3,-1468.71 v1@761.3,-1267.2
GND: C1.1 J1.7 J1.10 J1.12 J1.15 J1.16 J1.19 J1.20 J1.24 J1.25 J2.6 J2.7 LED1.2 P3.1 P6.1 P12.1 Q2.2 Q3.2 R6.1 R11.1 SW1.1 SW1.3 SW2.1 SW2.3 U1.9 U1.25 | length 723.7
  Top Layer w10: J1.7 593.98,-654.97 602.3,-663.29 640.03,-663.29 ; 593.98,-598.38 603.61,-588.75 ; 603.84,-588.75 611.3,-581.29
  Top Layer w20: C1.1 1149.3,-599.17 v1(1172.27,-622.14) ; R6.1@1271.16,-311.31 1271.16,-315.7 1274.27,-318.81 1278.66,-318.81 1290.49,-330.64 1312.16,-352.32 1312.16,-367 1318.3,-373.14 Q2.2 1322.24,-373.14 v1(1356.27,-339.14)
  Top Layer w25: R11.1 v1(163.27,-936.14) ; v1(194,-471) 232.14,-471 LED1.2 ; v1(1447.27,-888.37) SW2.1@1490.89,-888.37 ; v1(1447.27,-811.14) 1466.5,-791.91 SW2.3@1490.89,-791.91
  Bottom Layer w25: v1(194,-471) 287.24,-564.24 ; v1@1443.5,-888.37 1447.27,-884.6 v1(1447.27,-811.14)
  other v1: 661.03,-1267.17 711.03,-1267.17 661.03,-1217.17 711.03,-1217.17 761.03,-1217.17 661.03,-1167.17 661.03,-1117.17 611.03,-1067.17 661.03,-1067.17 900.03,-1067.17 950.03,-1067.17 611.03,-1017.17 661.03,-1017.17 711.03,-1017.17 900.03,-1017.17 950.03,-1017.17 1000.03,-1017.17 611.03,-967.17 661.03,-967.17 711.03,-967.17 900.03,-967.17 950.03,-967.17 1000.03,-967.17 956,-864.99 610.27,-862.14 660.27,-862.14 706.4,-862.14 764.27,-862.14 814.27,-862.14 864.27,-862.14 914.27,-862.14 610.27,-812.14 660.27,-812.14 706.4,-812.14 764.27,-812.14 814.27,-812.14 864.27,-812.14 914.27,-812.14 660.27,-762.14 706.4,-762.14 764.27,-762.14 814.27,-762.14 864.27,-762.14 914.27,-762.14 814.27,-712.14 864.27,-712.14 914.27,-712.14 614.32,-670.09 706.32,-670.09 764.32,-670.09 814.32,-670.09 864.32,-670.09 914.32,-670.09 701.3,-418.18 1418.27,-414.14 861.3,-374.14 911.3,-374.14 961.3,-374.14 1011.3,-374.14 701.3,-368.18 766.3,-368.18 861.3,-324.14 911.3,-324.14 961.3,-324.14 1011.3,-324.14 701.3,-318.18 766.3,-318.18 911.3,-274.14 961.3,-274.14 1011.3,-274.14 701.3,-268.18 766.3,-268.18 911.3,-217.31 961.3,-217.31 1110.91,-217.13 1160.91,-217.13 1210.91,-217.13 1260.91,-217.13 1310.91,-217.13 1360.91,-217.13 711.3,-167.31 761.3,-167.31 911.3,-167.31 961.3,-167.31 1011.3,-167.31 1011.3,-117.31 1110.91,-117.13 1110.91,-67.13 1010.91,-17.13 1060.91,-17.13 1110.91,-17.13 632.27,-11.14 1010.91,32.87 1060.91,32.87 1110.91,32.87 1010.91,82.87 1060.91,82.87 1110.91,82.87
  other v2: 161.03,-1717.17 186.03,-1717.17 311.03,-1717.17 336.03,-1717.17 361.03,-1717.17 386.03,-1717.17 511.03,-1717.17 536.03,-1717.17 561.03,-1717.17 586.03,-1717.17 711.03,-1717.17 736.03,-1717.17 761.03,-1717.17 911.03,-1717.17 936.03,-1717.17 161.03,-1692.17 186.03,-1692.17 311.03,-1692.17 336.03,-1692.17 361.03,-1692.17 386.03,-1692.17 486.03,-1692.17 511.03,-1692.17 536.03,-1692.17 561.03,-1692.17 586.03,-1692.17 686.03,-1692.17 711.03,-1692.17 736.03,-1692.17 761.03,-1692.17 786.03,-1692.17 886.03,-1692.17 911.03,-1692.17 936.03,-1692.17 161.03,-1667.17 186.03,-1667.17 311.03,-1667.17 336.03,-1667.17 361.03,-1667.17 386.03,-1667.17 511.03,-1667.17 536.03,-1667.17 561.03,-1667.17 586.03,-1667.17 711.03,-1667.17 736.03,-1667.17 761.03,-1667.17 911.03,-1667.17 936.03,-1667.17 161.03,-1642.17 186.03,-1642.17 336.03,-1642.17 361.03,-1642.17 386.03,-1642.17 536.03,-1642.17 561.03,-1642.17 711.03,-1642.17 736.03,-1642.17 761.03,-1642.17 911.03,-1642.17 936.03,-1642.17 161.03,-1617.17 186.03,-1617.17 336.03,-1617.17 361.03,-1617.17 386.03,-1617.17 536.03,-1617.17 561.03,-1617.17 711.03,-1617.17 736.03,-1617.17 761.03,-1617.17 911.03,-1617.17 161.03,-1592.17 186.03,-1592.17 336.03,-1592.17 361.03,-1592.17 386.03,-1592.17 536.03,-1592.17 561.03,-1592.17 711.03,-1592.17 736.03,-1592.17 761.03,-1592.17 736.03,-1570.17 761.03,-1570.17 161.03,-1567.17 336.03,-1567.17 361.03,-1567.17 536.03,-1567.17 561.03,-1567.17
IO_P0_0: J2.3 U1.1 | length 1137.8
  Top Layer w8: v1(1246.78,-648.14) 1279.09,-615.83 U1.1
  Bottom Layer w10: J2.3@662.27,-98.14 662.27,-429.14 716.27,-483.14 1169.85,-483.14 1246.78,-560.08 v1(1246.78,-648.14)
IO_P0_1: R3.1 U1.2 | length 1612.2
  Top Layer w8: v1(1214.27,-717.14) 1235.27,-717.14 1280.27,-672.14 1280.27,-636.14 1298.77,-617.64 U1.2
  Top Layer w15: v1@-86.75,-735.14 R3.1@-47.28,-735.14
  Bottom Layer w15: v1(-87.73,-735.14) 198.27,-735.14 313.27,-620.14 924.27,-620.14 1021.27,-717.14 v1(1214.27,-717.14)
IO_P0_2: R5.1 U1.3 | length 391.5
  Top Layer w10: v1(1308.27,-643.14) 1318.46,-632.95 U1.3
  Top Layer w12: v1(1238.17,-390.37) 1240.72,-390.37 1256.46,-374.64 1260.27,-374.64 1269.27,-365.64 R5.1
  Bottom Layer w10: v1(1238.17,-390.37) 1238.17,-438.04 1308.27,-508.14 v1(1308.27,-643.14)
IO_P0_3: LED2.2 U1.4 | length 1847.6
  Top Layer w8: U1.4@1338.13,-585.14 U1.4
  Top Layer w10: v1(1233.27,-757.14) 1338.27,-652.14 U1.4@1338.27,-585.14
  Top Layer w15: LED2.2 219.13,-1643.45 210.34,-1634.66 210.34,-1522.07 397.27,-1335.14 883.27,-1335.14 1012.27,-1206.14 1012.27,-1049.14 1104.27,-957.14 v1(1104.27,-923.14)
  Bottom Layer w10: v1(1104.27,-923.14) 1104.27,-886.14 v1(1233.27,-757.14)
IO_P0_4: LED3.2 U1.5 | length 1613
  Top Layer w10: v1(1269.94,-757.14) 1357.81,-669.27 U1.5
  Top Layer w15: LED3.2 446.5,-1643.02 476.98,-1643.02 v1(500,-1620) ; v1@620,-1358.14 888.7,-1358.14 1032.27,-1214.57 1032.27,-1067.14 1142.94,-956.48 v1(1142.94,-923.14)
  Bottom Layer w10: v1(1142.94,-923.14) 1142.94,-884.14 v1(1269.94,-757.14)
  Bottom Layer w15: v1(500,-1620) 500,-1480 v1(620,-1360)
IO_P0_5: LED4.2 U1.6 | length 1488.3
  Top Layer w10: v1(1306.61,-757.14) 1377.51,-686.23 U1.6
  Top Layer w15: LED4.2@643.35,-1643.02 653.2,-1643.02 675.69,-1620.52 675.69,-1399.93 689.93,-1385.69 889.44,-1385.69 1052.27,-1222.86 1052.27,-1084.14 1181.61,-954.81 v1(1181.61,-923.14)
  Bottom Layer w10: v1(1181.61,-923.14) 1181.61,-882.14 v1(1306.61,-757.14)
IO_P0_6: LED5.2 U1.7 | length 1328.6
  Top Layer w10: v1(1343.27,-757.14) 1404.48,-695.93 U1.7
  Top Layer w15: LED5.2 842.11,-1641.11 851.96,-1641.11 880,-1613.06 880,-1423.41 1072.27,-1231.14 1072.27,-1101.14 1223.27,-950.14 v1(1223.27,-923.14)
  Bottom Layer w10: v1(1223.27,-923.14) 1223.27,-877.14 v1(1343.27,-757.14)
IO_P0_7: SW2.2 U1.8 | length 465.2
  Top Layer w10: U1.8 v1@1445.27,-534.84 ; SW2.2 1434.27,-840.14 1415.27,-821.14 1415.27,-791.14 1465.27,-741.14 1465.27,-676.12 v1(1497.26,-644.13)
  Bottom Layer w10: v1(1447.27,-534.84) 1497.26,-584.83 v1(1497.26,-644.13)
IO_P1_0: P16.1 U1.10 | length 616.6
  Top Layer w10: U1.10 1436.94,-495.47 v1(1450.27,-482.14)
  Bottom Layer w10: P16.1 1298.27,-882.14 1524.27,-656.14 1524.27,-556.14 v1(1450.27,-482.14)
IO_P1_1: P17.1 U1.11 | length 643.2
  Top Layer w10: U1.11 1420.99,-475.78 1452.27,-444.5 v1(1452.27,-443.14)
  Bottom Layer w10: P17.1 1392.27,-830.14 1544.27,-678.14 1544.27,-537.25 1452.27,-445.25 v1(1452.27,-443.14)
NetC2_1: C2.1 Q1.1 R2.1 R12.2 | length 441.6
  Top Layer w25: Q1.1@-47.25,-539.14 -47.25,-645.5 -32.6,-660.14 C2.1@11.27,-660.14 ; C2.1@13.27,-660.14 C2.1@11.27,-660.14 ; R12.2 27.27,-763.14 11.27,-747.14 R2.1 C2.1 C2.1@11.27,-660.14
NetD1_1: D1.1 P7.1 Q2.3 | length 260.8
  Top Layer w20: Q2.3 Q2.3@1399.14,-335.87 ; v1@1399.14,-369.01 v1(1399.27,-369.14)
  Top Layer w30: v1@1399.14,-369.01 Q2.3@1399.14,-335.87
  Bottom Layer w30: v1(1399.27,-369.14) 1465.3,-369.14 P7.1
NetJ1_13: J1.13 P1.1 | length 424
  Top Layer w10: P1.1 711.3,-219.05 732.23,-239.98 732.23,-537.09 712.09,-557.24 J1.13
NetLED1_1: LED1.1 R4.1 | length 90.5
  Top Layer w15: LED1.1 R4.1
NetLED2_1: LED2.1 R7.1 | length 253.2
  Top Layer w10: LED2.1 249.22,-1530.78 300,-1480 380,-1480 391.03,-1491.03 R7.1
NetLED3_1: LED3.1 R8.1 | length 114.7
  Top Layer w12: LED3.1 495.61,-1584.39 504.03,-1575.97 R8.1 R8.1@504.31,-1523.45
NetLED4_1: LED4.1 R9.1 | length 62.1
  Top Layer w15: LED4.1 643.97,-1583.34 643.97,-1524.23 R9.1
NetLED5_1: LED5.1 R10.1 | length 62.2
  Top Layer w15: LED5.1 840.9,-1583.26 840.9,-1524.3 R10.1
NetP5_1: P5.1 Q1.2 R4.2
  other v1: -88.97,-167.17 -88.97,-142.17 -63.97,-142.17 -38.97,-142.17 -13.97,-142.17 11.03,-142.17 36.03,-142.17 61.03,-142.17 -88.97,-117.17 -63.97,-117.17 -38.97,-117.17 -13.97,-117.17 11.03,-117.17 36.03,-117.17 61.03,-117.17 -88.97,-92.17 -63.97,-92.17 -38.97,-92.17 -13.97,-92.17 11.03,-92.17 36.03,-92.17 61.03,-92.17 86.03,-92.17 -88.97,-67.17 -63.97,-67.17 -38.97,-67.17 -13.97,-67.17 11.03,-67.17 36.03,-67.17 61.03,-67.17 86.03,-67.17 -88.97,-42.17 -63.97,-42.17 -38.97,-42.17 36.03,-42.17 61.03,-42.17 86.03,-42.17 -88.97,-17.17 -63.97,-17.17 61.03,-17.17 86.03,-17.17 -88.97,7.83 -63.97,7.83 61.03,7.83 86.03,7.83 -87.97,32.83 -63.97,32.83 61.03,32.83 86.03,32.83 -63.97,57.83 -38.97,57.83 -13.97,57.83 11.03,57.83 36.03,57.83 61.03,57.83 86.03,57.83 -38.97,82.83 -13.97,82.83 11.03,82.83 36.03,82.83 61.03,82.83 86.03,82.83
NetQ2_1: Q2.1 R5.2 R6.2 | length 184.2
  Top Layer w12: R5.2 1209.27,-308.81 1218.27,-299.81 1220.77,-299.81 1239.75,-280.84 1302.77,-280.84 Q2.1
NetQ3_1: Q3.1 R3.2 R11.2 | length 186.3
  Top Layer w20: R11.2@57.27,-924.14 R11.2@57.27,-921.64
  Top Layer w25: R3.2@-46.73,-794.14 -46.73,-839.14 -8.73,-877.14 43.77,-877.14 51.77,-885.14 51.77,-906.39
NetQ3_3: Q3.3 R12.1 | length 107.3
  Top Layer w25: Q3.3 110.64,-823.14 R12.1
NetR1_1: R1.1 U1.24 | length 54.5
  Top Layer w10: R1.1 1210.09,-554.52 U1.24
NetR13_1: R13.1 U1.16 | length 342.6
  Top Layer w10: R13.1 v1(1153,-318) ; U1.16 1318.58,-429.01 1318.58,-406.75 1324.44,-400.9 1340.91,-400.9 v1(1360,-381.81)
  Bottom Layer w10: v1(1153,-318) 1296.19,-318 v1(1360,-381.81)
NetR14_1: R14.1 U1.17 | length 240.8
  Top Layer w10: R14.1 v1(1188,-404) ; v1(1265.9,-397.45) 1267.45,-399 1292.8,-399 1298.66,-404.86 1298.66,-429.01 U1.17
  Bottom Layer w10: v1(1188,-404) 1188,-372 1199,-361 1257,-361 1265.9,-369.9 v1(1265.9,-397.45)
SCL: J1.18 J2.5 P14.1 P15.1 U1.19 | length 1213.6
  Top Layer w8: v1(1211.27,-428.14) 1211.27,-449.14 1218.23,-456.1 U1.19
  Top Layer w10: J1.18 810.51,-450.04 v1(832.42,-428.14) 817.95,-413.67 817.95,-110.67 J2.5
  Top Layer w12: P14.1 P14.1@862.27,47.69 ; J2.5@862.27,-67.31 P14.1@862.27,47.69 ; P15.1 P14.1@862.27,47.69
  Bottom Layer w10: v1(832.42,-428.14) v1(1211.27,-428.14)
SDA: J1.17 J2.4 P10.1 P11.1 U1.20 | length 1265.5
  Top Layer w10: J2.4 801,-107.01 801,-403.23 v1@777,-427.23 ; v1(776.09,-428.14) 790.83,-442.89 J1.17 ; v1(1191.27,-465.42) 1201.63,-475.78 U1.20
  Top Layer w12: P10.1 P11.1 ; J2.4@762.27,-67.31 P11.1@762.27,47.69
  Bottom Layer w10: v1@775,-428 775.94,-428 v1(776.09,-428.14) 813.37,-465.42 v1(1191.27,-465.42)
SW: J1.11 SW1.2 | length 1763.1
  Top Layer w10: J1.11 672.72,-698.69 571.27,-800.14 571.27,-1261.14 609.49,-1299.36 862.81,-1299.36 v1(875.81,-1299.36) ; v1(1034.27,-1664.14) 1034.27,-1699.14 1141.3,-1806.17 SW1.2
  Bottom Layer w10: v1(875.81,-1299.36) 912.27,-1335.82 912.27,-1416.14 943.27,-1447.14 1043.27,-1447.14 1071.27,-1475.14 1071.27,-1627.45 1034.58,-1664.14 v1(1034.27,-1664.14)
VBAT: C2.2 J1.1 J1.2 J1.3 J1.4 J1.5 J1.6 J2.1 J2.2 P9.1 Q1.3 R2.2 | length 593.4
  Bottom Layer w25: P9.1@449.27,-1262.19 P9.1
  Bottom Layer w80: P9.1@470.75,-1240.3 470.75,-762.45 ; 470.75,-760.03 470.75,-762.45 ; v1(529.03,-704.17) v1(504.03,-729.17) 470.75,-762.45
  other v1: 529.03,-729.17 554.03,-729.17 504.03,-704.17 554.03,-704.17 504.03,-679.17 529.03,-679.17 554.03,-679.17
pads on no net: J1.8 J1.9 J1.S1 J1.S2 SW1. SW1.S1 SW1.S2 SW2. SW2.S1 SW2.S2 U1.12 U1.13 U1.14 U1.15 U1.22

## Polygon pours and split planes (outlines as drawn)
GND on Top Layer "Polygon_1_Net_0V" (solid, remove dead copper, pour order 6): 591.03,117.52 591.03,-137.17 591.03,-297.17 1639.46,-297.17 1639.46,117.52
GND on Top Layer "Polygon_4_Net_0V" (solid, remove dead copper, pour order 4): 1274.71,-1455.58 1306.08,-1478.02 1315.02,-1478.02 1435.09,-1534.14 1435.09,-2023.76 86.97,-2023.76 86.97,-1564.54 86.97,-1561.01 cw(c122.14,-1561.01) 97.27,-1536.14 98.77,-1534.65 cw(c148.23,-1584.1) 121.47,-1519.48 cw(c158.49,-1556.48) 158.49,-1504.14 173.27,-1501.14 206.94,-1486.14 244.27,-1460.14 260.52,-1445.14 1264.27,-1445.14
GND on Top Layer "Polygon_5_Net_0V" (solid, remove dead copper, pour order 11): 606.03,-165.17 606.03,-2023.86 1207.03,-2023.86 1207.03,-165.17
GND on Top Layer "NONET_L-01_P-001" (solid, pour order 18): 1423.27,-694.14 1631.27,-694.14 1631.27,-957.14 1613.27,-975.14 1423.27,-975.14
VBAT on Top Layer "Polygon_2_Net_+12V" (solid, remove dead copper, pour order 15): 312.63,-160.14 313.63,-159.14 370.27,-159.14 370.27,117.96 587.63,117.96 587.63,-740.14 67.27,-740.14 52.63,-725.5 52.63,-556.78 87.27,-522.14 312.63,-522.14
GND on Top Layer "Polygon_6_Net_0V" (solid, remove dead copper, pour order 10): 1203.23,-411.13 1203.27,-411.08 1203.27,-356.14 1479.27,-356.14 1479.27,-618.14 1203.23,-618.14
NetP5_1 on Top Layer "Polygon_1_Net_ESC_+" (solid, remove dead copper, pour order 13): -117.84,117.96 296.03,117.96 296.03,-443.14 -117.84,-443.14
+5V on Top Layer "Polygon_1_Net_+5V" (solid, remove dead copper, pour order 5): 1278.31,-784.29 1385.27,-784.29 1385.27,-895.29 1278.31,-895.29
GND on Bottom Layer "Polygon_2_Net_0V" (solid, remove dead copper, pour order 16): 361.03,117.96 361.03,-450.1 298.96,-512.17 -117.84,-512.17 -117.84,-2023.76 1639.9,-2023.76 1639.9,117.96
VBAT on Bottom Layer "VBAT_L02_P012" (solid, remove dead copper, pour order 12): 325.27,-1349.14 329.92,-1340.19 589.27,-1340.19 589.27,-1358.69 701.51,-1470.93 1052.06,-1470.93 1065.27,-1484.14 1065.27,-1577.14 303.66,-1577.14 303.66,-1390.3
NetP5_1 on Bottom Layer "Polygon_2_Net_ESC_+" (solid, remove dead copper, pour order 0): -117.84,117.96 296.03,117.96 296.03,-419.14 -117.84,-419.14 -117.84,-372.17
VBAT on Bottom Layer "Polygon_3_Net_+12V" (solid, remove dead copper, pour order 9): 488.27,-664.93 488.27,-744.17 569.03,-744.17 569.03,-659.17 494.03,-659.17

## Keep-outs
Keep-Out Layer:
  lines w6: -117.84,-0.15 cw(c0.27,-0.14) -10.03,117.52 0.27,117.96

## Other copper
Top Layer:
  rectangle net +5V: 963,-645 1051,-599
  rectangle net +3V3: 1100,-490 1170,-460
  rectangle net +3V3: 1069,-490 1110,-304
  rectangle net NetD1_1: 1529.27,-618.14 1634.27,-421.14
  rectangle net GND: 102.27,-958.39 143.27,-854.39
  region net NetQ3_1: 72.27,-854.39 31.27,-854.39 31.27,-958.39 72.27,-958.39
Bottom Layer:
  rectangle net VBAT: 488.27,-754.14 570.96,-659.17

## Silkscreen, mask and mechanical layers (free items; w line width, h text height)
Top Overlay:
  drawing of 1850 lines, arcs and shapes, not listed
  text "SDA2" at 499.27,28.86 h40
  text "SCL2" at 978.27,26.86 h40
  text "+" at 1555.27,-165.14 h80
  text "+VE" at 239.7,-208.25 h70
  text "-VE" at 1162.98,-210 h70
  text "_" at 1552.27,-392.14 h80
  text "FAN" at 1524.27,-447.14 h75 r90
  text "SPSU" at 599.45,-972.17 h85
  text ">VERSION_4.0.0" at 358.27,-1344.14 h62.5
Bottom Overlay:
  text "5V" at 1039.27,-255.14 h45 r270
  text "GND" at 834.27,-369.14 h45 r270
  text "3V3" at 1147.33,-491.46 h45
  text "SP2" at 1280.27,-884.14 h40 r270
  text "SP1" at 1374.27,-884.14 h40 r270
  text "DOCK-COMM" at 694.27,-1500.14 h48
Board_Outline:
  the board outline again, w6
Fabrication:
  drawing of 191 lines, arcs and shapes, not listed
  text "Layer" at 3100.58,-1286 h60
  text "Name" at 3510.49,-1286 h60
  text "Material" at 4440.23,-1286 h60
  text "Thickness" at 5300,-1286 h60
  text "Constant" at 5949.84,-1286 h60
  text "Board Layer Stack" at 6519.7,-1286 h60
  text "Top Overlay" at 3510.49,-1406 h60
  text "Top Solder" at 3510.49,-1526 h60
  text "Solder Resist" at 4440.23,-1526 h60
  text "0.39mil" at 5300,-1526 h60
  text "3.5" at 5949.84,-1526 h60
  text "1" at 3100.58,-1646 h60
  text "Top Layer" at 3510.49,-1646 h60
  text "1.38mil" at 5300,-1646 h60
  text "Dielectric 1" at 3510.49,-1766 h60
  text "FR-4" at 4440.23,-1766 h60
  text "59.06mil" at 5300,-1766 h60
  text "4.8" at 5949.84,-1766 h60
  text "2" at 3100.58,-1886 h60
  text "Bottom Layer" at 3510.49,-1886 h60
  text "1.38mil" at 5300,-1886 h60
  text "Bottom Solder" at 3510.49,-2006 h60
  text "Solder Resist" at 4440.23,-2006 h60
  text "0.39mil" at 5300,-2006 h60
  text "3.5" at 5949.84,-2006 h60
  text "Bottom Overlay" at 3510.49,-2126 h60
  text "Total board thickness:" at 3100.58,-2246 h60
  text "62.60mil" at 5300,-2246 h60
Drill Drawing:
  circle w10: c2976.67,462.33 r20
  circle w10: c2976.67,462.33 r33.33
  circle w10: c2976.67,12.33 r33.33
  lines w10: 2943.33,-771 3010,-771 3010,-704.33 2943.33,-704.33 2943.33,-771 ; 2943.33,-554.33 3010,-554.33 2976.67,-621 2943.33,-554.33 ; 2943.33,-471 2943.33,-454.33 2960,-437.67 2943.33,-421 2943.33,-404.33 2960,-404.33 2976.67,-421 2993.33,-404.33 3010,-404.33 3010,-421 2993.33,-437.67 3010,-454.33 3010,-471 2993.33,-471 2976.67,-454.33 2960,-471 2943.33,-471 ; 2943.33,-304.33 2960,-304.33 2960,-321 2993.33,-321 2993.33,-304.33 3010,-304.33 3010,-271 2993.33,-271 2993.33,-254.33 2960,-254.33 2960,-271 2943.33,-271 2943.33,-304.33 ; 2943.33,-137.67 2976.67,-171 3010,-137.67 2976.67,-104.33 2943.33,-137.67 ; 2943.33,129 3010,129 3010,195.67 2943.33,195.67 2943.33,129 ; 2943.33,295.67 2960,295.67 2976.67,279 2993.33,295.67 3010,295.67 2993.33,312.33 3010,329 2993.33,329 2976.67,345.67 2960,329 2943.33,329 2960,312.33 2943.33,295.67 ; 2943.33,579 2976.67,595.67 3010,579 2993.33,612.33 3010,645.67 2976.67,629 2943.33,645.67 2960,612.33 2943.33,579 ; 2943.33,795.67 3010,795.67 2976.67,729 2943.33,795.67 ; 2943.33,895.67 2960,895.67 2976.67,879 2993.33,895.67 3010,895.67 2993.33,912.33 3010,929 2993.33,929 2976.67,945.67 2960,929 2943.33,929 2960,912.33 2943.33,895.67 ; 2956.67,-757.67 2996.67,-757.67 2996.67,-717.67 2956.67,-717.67 2956.67,-757.67 ; 2956.67,782.33 2996.67,782.33 2976.67,742.33 2956.67,782.33 ; 2956.67,902.33 2966.67,902.33 2976.67,892.33 2986.67,902.33 2996.67,902.33 2986.67,912.33 2996.67,922.33 2986.67,922.33 2976.67,932.33 2966.67,922.33 2956.67,922.33 2966.67,912.33 2956.67,902.33
  lines w15: 2883.54,-816 10543.43,-816 ; 2883.54,984 10543.43,984 ; 3434.42,-966 3434.42,1134 ; 4034.26,-966 4034.26,1134 ; 5153.93,-966 5153.93,1134 ; 5659.81,-966 5659.81,1134 ; 6393.61,-966 6393.61,1134 ; 7893.16,-966 7893.16,1134 ; 8483.01,-966 8483.01,1134 ; 9228.81,-966 9228.81,1134 ; 2883.54,-966 10543.43,-966 10543.43,1134 2883.54,1134 2883.54,-966
  text "Symbol" at 2973.54,1029 h72
  text "Count" at 3479.42,1029 h72
  text "Hole Size" at 4079.26,1029 h72
  text "Plated" at 5198.93,1029 h72
  text "Hole Type" at 5704.81,1029 h72
  text "Drill Layer Pair" at 6438.61,1029 h72
  text "Via/Pad" at 7938.16,1029 h72
  text "Pad Shape" at 8528.01,1029 h72
  text "Template" at 9273.81,1029 h72
  text "89" at 3479.42,879 h60
  text "11.81mil (0.300mm)" at 4079.26,879 h60
  text "PTH" at 5198.93,879 h60
  text "Round" at 5704.81,879 h60
  text "Top Layer - Bottom Layer" at 6438.61,879 h60
  text "Via" at 7938.16,879 h60
  text "Rounded" at 8528.01,879 h60
  text "v60h30m0mx0(1)" at 9273.81,879 h60
  text "214" at 3479.42,729 h60
  text "11.81mil (0.300mm)" at 4079.26,729 h60
  text "PTH" at 5198.93,729 h60
  text "Round" at 5704.81,729 h60
  text "Top Layer - Bottom Layer" at 6438.61,729 h60
  text "Via" at 7938.16,729 h60
  text "Rounded" at 8528.01,729 h60
  text "v60h30m0mx0" at 9273.81,729 h60
  text "5" at 3479.42,579 h60
  text "23.62mil (0.600mm)" at 4079.26,579 h60
  text "PTH" at 5198.93,579 h60
  text "Round" at 5704.81,579 h60
  text "Top Layer - Bottom Layer" at 6438.61,579 h60
  text "Pad" at 7938.16,579 h60
  text "Rounded" at 8528.01,579 h60
  text "c111h60_503323056" at 9273.81,579 h60
  text "4" at 3479.42,429 h60
  text "32.01mil (0.813mm)" at 4079.26,429 h60
  text "PTH" at 5198.93,429 h60
  text "Round" at 5704.81,429 h60
  text "Top Layer - Bottom Layer" at 6438.61,429 h60
  text "Pad" at 7938.16,429 h60
  text "Octagonal" at 8528.01,429 h60
  text "s160h81c50_503323056" at 9273.81,429 h60
  text "4" at 3479.42,279 h60
  text "35.43mil (0.900mm)" at 4079.26,279 h60
  text "NPTH" at 5198.93,279 h60
  text "Round" at 5704.81,279 h60
  text "Top Layer - Bottom Layer" at 6438.61,279 h60
  text "Pad" at 7938.16,279 h60
  text "Rounded" at 8528.01,279 h60
  text "c0hn90" at 9273.81,279 h60
  text "7" at 3479.42,129 h60
  text "35.43mil (0.900mm)" at 4079.26,129 h60
  text "PTH" at 5198.93,129 h60
  text "Round" at 5704.81,129 h60
  text "Top Layer - Bottom Layer" at 6438.61,129 h60
  text "Pad" at 7938.16,129 h60
  text "(Mixed)" at 8528.01,129 h60
  text "(Mixed)" at 9273.81,129 h60
  text "2" at 3479.42,-21 h60
  text "40.00mil (1.016mm)" at 4079.26,-21 h60
  text "PTH" at 5198.93,-21 h60
  text "Round" at 5704.81,-21 h60
  text "Top Layer - Bottom Layer" at 6438.61,-21 h60
  text "Pad" at 7938.16,-21 h60
  text "Octagonal" at 8528.01,-21 h60
  text "s254h102c50" at 9273.81,-21 h60
  text "2" at 3479.42,-171 h60
  text "60.00mil (1.524mm)" at 4079.26,-171 h60
  text "NPTH" at 5198.93,-171 h60
  text "Round" at 5704.81,-171 h60
  text "Top Layer - Bottom Layer" at 6438.61,-171 h60
  text "Pad" at 7938.16,-171 h60
  text "Rounded" at 8528.01,-171 h60
  text "c152hn152" at 9273.81,-171 h60
  text "8" at 3479.42,-321 h60
  text "75.98mil (1.930mm)" at 4079.26,-321 h60
  text "NPTH" at 5198.93,-321 h60
  text "Round" at 5704.81,-321 h60
  text "Top Layer - Bottom Layer" at 6438.61,-321 h60
  text "Pad" at 7938.16,-321 h60
  text "Rounded" at 8528.01,-321 h60
  text "c193hn193" at 9273.81,-321 h60
  text "2" at 3479.42,-471 h60
  text "78.74mil (2.000mm)" at 4079.26,-471 h60
  text "NPTH" at 5198.93,-471 h60
  text "Round" at 5704.81,-471 h60
  text "Top Layer - Bottom Layer" at 6438.61,-471 h60
  text "Pad" at 7938.16,-471 h60
  text "Rounded" at 8528.01,-471 h60
  text "c200hn200" at 9273.81,-471 h60
  text "2" at 3479.42,-621 h60
  text "78.74mil (2.000mm)" at 4079.26,-621 h60
  text "PTH" at 5198.93,-621 h60
  text "Round" at 5704.81,-621 h60
  text "Top Layer - Bottom Layer" at 6438.61,-621 h60
  text "Pad" at 7938.16,-621 h60
  text "Rectangle" at 8528.01,-621 h60
  text "s645h200" at 9273.81,-621 h60
  text "1" at 3479.42,-771 h60
  text "118.11mil (3.000mm)" at 4079.26,-771 h60
  text "NPTH" at 5198.93,-771 h60
  text "Round" at 5704.81,-771 h60
  text "Top Layer - Bottom Layer" at 6438.61,-771 h60
  text "Pad" at 7938.16,-771 h60
  text "Rounded" at 8528.01,-771 h60
  text "c300hn300" at 9273.81,-771 h60
  text "340 Total" at 3479.42,-921 h60

## Dimensions
1521.79,117.96 to 1146.27,-2027.14 on Dimension
206.94,-1945 to 1312.52,-1954.94 on Dimension
-117.84,-0.15 to 1639.9,-0.15 on Dimension

## Text inside footprints (layer, text, board x,y; h text height)
J1: Top Overlay "1" at 469.07,-709.29 h40